# Altium PCB TYH-PD67W 2C1A AC板.pcbdoc
Units mm, origin at the board's own origin, x right, y up, seen from the top; angles counter-clockwise.
Board outline 94.32 x 66.89 mm, 5 copper layers (Top Layer, Signal Layer 3, Signal Layer 1, Signal Layer 2, Bottom Layer), stack 0.941 mm thick; 7 components, 153 nets, 24 pads, 78 vias.
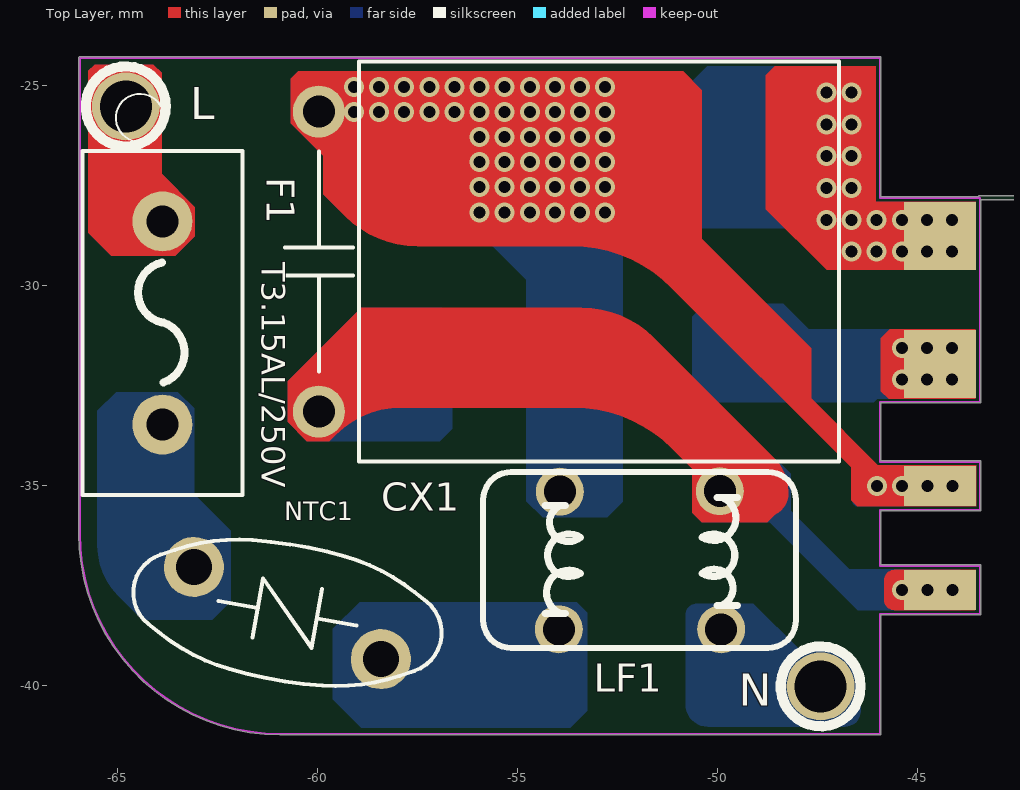
[diagram p0: Top Layer view]
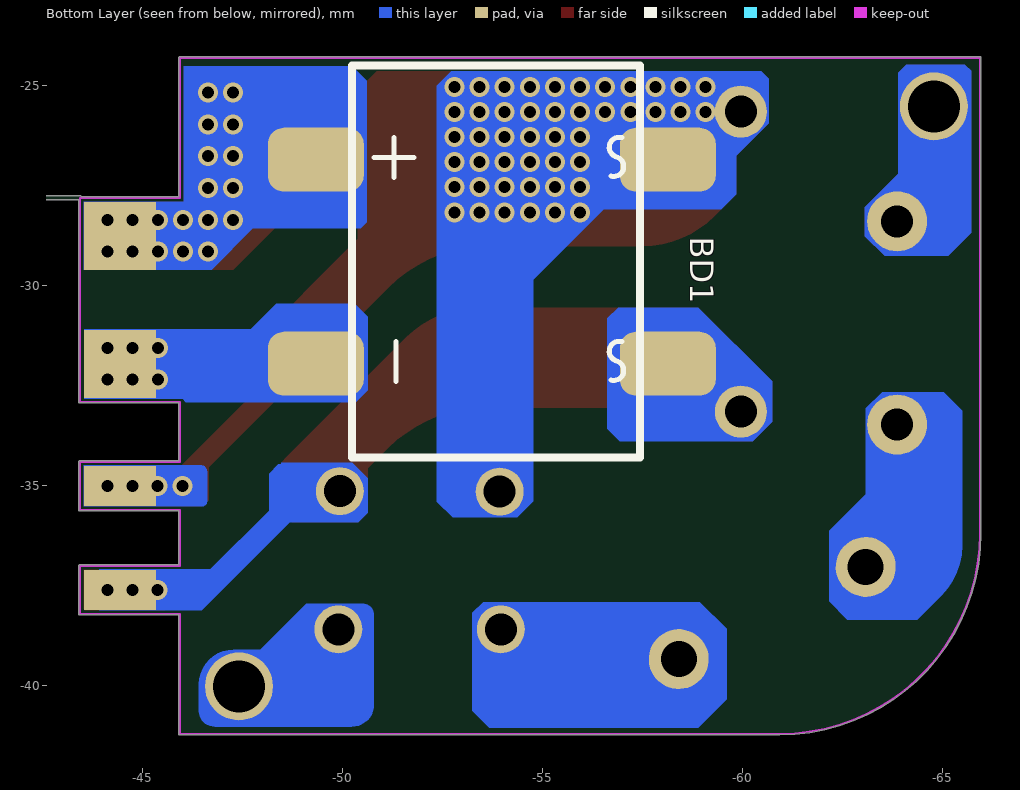
[diagram p1: Bottom Layer view, seen from below]

## Layer stack, top to bottom
Top Solder: solder mask 0.0102, Solder Resist, Dk 3.5
Top Layer: signal copper 0.0356
Dielectric 1: core 0.254, FR-4, Dk 4.2
Signal Layer 3: signal copper 0.036
Dielectric 4: prepreg 0.127, Dk 4.2
Signal Layer 1: signal copper 0.036
Dielectric 2: core 0.254, Dk 4.2
Signal Layer 2: signal copper 0.036
Dielectric 3: prepreg 0.127, Dk 4.2
Bottom Layer: signal copper 0.0356
Bottom Solder: solder mask 0.0102, Solder Resist, Dk 3.5

## Board outline
-60.945,-41.225 -45.944,-41.225 ccw(c-45.944,-41.2) -45.919,-41.2 -45.919,-38.225 -43.445,-38.225 ccw(c-43.445,-38.2) -43.419,-38.2 -43.419,-37 ccw(c-43.445,-37) -43.445,-36.975 -45.919,-36.975 -45.919,-35.625 -43.445,-35.625 ccw(c-43.445,-35.6) -43.419,-35.6 -43.419,-34.4 ccw(c-43.445,-34.4) -43.445,-34.375 -45.919,-34.375 -45.919,-32.925 -43.445,-32.925 ccw(c-43.445,-32.9) -43.419,-32.9 -43.419,-27.85 -39.751,-27.85 -39.759,-40.693 ccw(c-39.709,-40.7) -39.709,-40.75 -29.759,-40.752 -29.76,-42.002 ccw(c-29.71,-42.002) -29.71,-42.052 0,-42.052 ccw(c0,-42.002) 0.05,-42.002 0.05,-37.55 2.5,-37.55 ccw(c2.5,-37.5) 2.55,-37.5 2.55,-32.55 5.163,-32.55 5.16,-37.409 ccw(c5.21,-37.409) 5.16,-37.409 ccw(c8.207,-37.409) 8.207,-40.456 ccw(c8.207,-40.406) 8.207,-40.456 ccw(c8.207,-40.406) 8.207,-40.456 25.296,-40.456 ccw(c25.296,-40.406) 25.308,-40.455 ccw(c25.296,-37.407) 28.344,-37.407 28.352,-4.393 ccw(c28.302,-4.393) 28.352,-4.393 ccw(c28.302,-4.393) 28.351,-4.381 ccw(c25.304,-4.393) 25.304,-1.346 8.229,-1.346 ccw(c8.229,-4.393) 5.181,-4.375 ccw(c5.228,-4.393) 5.178,-4.393 5.175,-9.653 ccw(c5.225,-9.653) 5.225,-9.703 6.674,-9.704 6.673,-10.703 5.225,-10.702 ccw(c5.225,-10.753) 5.174,-10.753 5.163,-32.45 0.05,-32.45 0.05,-9.32 2.5,-9.32 ccw(c2.5,-9.269) 2.55,-9.269 2.55,-2.769 ccw(c2.5,-2.769) 2.5,-2.719 0.05,-2.719 0.05,0 ccw(c0,0) 0,0.05 -29.65,0.05 -29.65,1.682 2.433,1.682 ccw(c2.433,1.733) 2.483,1.733 ccw(c2.433,1.733) 2.482,1.745 ccw(c2.45,1.784) 2.5,1.784 2.5,3.584 ccw(c2.45,3.584) 2.45,3.635 0,3.635 0,22.484 ccw(c-0.05,22.484) -0.014,22.52 ccw(c-0.05,22.484) -0.05,22.535 -13.768,22.535 -13.768,24.784 ccw(c-13.819,24.784) -13.819,24.835 -26.819,24.835 ccw(c-26.819,24.784) -26.869,24.784 -26.869,22.535 -27.789,22.535 ccw(c-27.789,22.484) -27.84,22.483 -27.84,20.784 cw(c-28.289,20.784) -28.289,20.335 cw(c-28.289,20.784) -28.289,20.335 cw(c-28.289,20.284) -28.289,20.335 -30.217,20.335 ccw(c-30.217,20.284) -30.268,20.284 -30.268,1.733 ccw(c-30.217,1.733) -30.217,1.682 -29.75,1.682 -29.75,-1.25 -31.7,-1.25 ccw(c-31.7,-1.3) -31.75,-1.3 -31.75,-26.75 -39.7,-26.75 ccw(c-39.7,-26.8) -39.75,-26.8 -39.751,-27.75 -43.445,-27.75 ccw(c-43.445,-27.8) -43.488,-27.775 -45.919,-27.775 -45.919,-24.3 ccw(c-45.945,-24.3) -45.945,-24.275 -65.945,-24.275 ccw(c-65.945,-24.3) -65.97,-24.3 -65.97,-36.2 ccw(c-60.945,-36.2)

## Design rules (kind name [scope] priority, off if disabled: settings)
Clearance Clearance_19 [InNet('NetC4_2') vs InNet('PGND')] p1: gap=0.4
Clearance Clearance_18 [InNet('NetR15_1') vs InNet('PGND')] p2: gap=1
Clearance Clearance_17 [InNet('NetN_1') vs InNet('NetBD1_1')] p3: gap=1.55
Clearance Clearance_16 [InNet('NetN_1') vs InNet('PGND')] p4: gap=1.5
Clearance Clearance_15 [InNet('VIN') vs InNet('PGND')] p5 off: gap=5.8
Clearance Clearance_14 [InNet('CS') vs InNet('Bais-L')] p6: gap=0.45
Clearance Clearance_13 [InNet('SW') vs InNet('CS')] p7: gap=1.5
Clearance Clearance_12 [InNet('NetR15_1') vs InNet('CS')] p8: gap=1
Clearance Clearance_11 [InNet('NetBD1_3') vs InNet('CS')] p9: gap=1.1
Clearance Clearance_10 [InNet('HV') vs InNet('CS')] p10: gap=1.1
Clearance Clearance_9 [InNet('NetL2_1') vs InNet('CS')] p11: gap=1.5
Clearance Clearance_8 [InNet('NetC1_2') vs InNet('PGND')] p12: gap=1.2
Clearance Clearance_7 [InNet('NetBD1_3') vs InNet('PGND')] p13: gap=1.2
Clearance Clearance_6 [InNet('NetC2_2') vs InNet('PGND')] p14: gap=1.3
Clearance Clearance_5 [InNet('Bais-L') vs InNet('PGND')] p15: gap=0.45
Clearance Clearance_4 [InNet('SW') vs InNet('PGND')] p16: gap=1.5
Clearance Clearance_3 [InNet('HV') vs InNet('PGND')] p17: gap=1.2
Clearance Clearance_2 [InNet('NetL2_1') vs InNet('PGND')] p18: gap=1.5
Clearance Clearance_1 [OnLayer('Keep-Out Layer')] p19: gap=0.1
Clearance [All] p20: gap=0.2
PlaneConnect [All] p1: planeconnectstyle=Direct reliefexpansion=0.508 reliefentries=4 reliefconductorwidth=0.3 reliefairgap=0.254
PolygonConnect [All] p1: connectstyle=Direct reliefconductorwidth=0.3 reliefentries=4 polygonreliefangle="90 Angle" airgapwidth=0.3
RoutingVias [All] p1: holewidth=0.711 width=1.27 viastyle="Through Hole" minholewidth=0.711 minwidth=1.27 maxholewidth=0.711 maxwidth=1.27
SolderMaskExpansion [All] p1: expansion=0.05
Width [All] p1: maxlimit=10 minlimit=0.1 preferedwidth=0.2
28 further rules are at their usual default settings.

## Components (designator, comment, footprint, x,y, rotation, side; value= is the part's Value field where it differs from the comment)
BD1 "WRMSB40M" BD-WRLSB80M -49.344,-26.848 r180 bottom
CX1 "0.1uF" X-0.22SW -59.97,-33.147 r90 top
F1 "T3.15AL/250V" FUSE-5mm-l -63.878,-28.388 r270 top
L "Comment" PAD-AC -64.796,-25.515 r90 top
LF1 "Comment" L-6*3*3 -48.24,-36.854 r270 top
N "Comment" PAD-AC -47.423,-40.013 r90 top
NTC1 "" 5D-7-2 -61.365,-38.051 r160 top (schematic designator NTC)

## Footprints (in the part's own frame and the unit in brackets; to place one, negate y for a bottom-side part, rotate by r counter-clockwise, add the part's x,y. Pads: shape width x height; smd on the part's side, far side on the other; paste and mask are expansions set on the pad)
5D-7-2 [mm]
  round 1.5 hole 0.9: 1(1.973,-0.371) 2(-3.207,0.197)
  silkscreen extent -4.47,-1.92 3.24,1.74, body extent -5.36,-2.63 4.13,2.46, height 9.5
BD-WRLSB80M [mm]
  rrect50% 2.4x1.6 smd: 1(0,0) 2(8.8,0) 3(8.8,-5.1) 4(0,-5.1)
  silkscreen extent 0.9,-7.45 8.1,2.35, body extent -0.61,-7.55 9.39,2.45, height 1.61
FUSE-5mm-l [mm]
  round 1.5 hole 0.8: 1(0,0) 2(5.08,0)
  silkscreen extent -1.76,-2 6.84,2, body extent -1.76,-2 6.84,2, height 5.2
L-6*3*3 [mm]
  round 1.2 hole 0.8: 1(1.733,-5.729) 2(1.734,-1.669) 3(-1.708,-5.703) 4(-1.72,-1.706)
  silkscreen extent -2.2,-7.62 2.2,0.2, body extent -1.95,-7.4 2,0.02, height 7.21
PAD-AC [mm]
  round 1.7 hole 1.3: 1(0,0)
  silkscreen extent -1,-1 1,1
X-0.22SW [mm]
  round 1.3 hole 0.8: 1(0,0) 2(7.5,0)
  silkscreen extent -1.25,-13 8.75,0.85, body extent -1.25,-13 8.75,0.2, height 5.2

## Part data
BD1: library part BRIDGE1
CX1: library part Cap_dip, "Capacitor"
F1: library part FUSE2
NTC1: library part NTC

## Free pads (board coordinates)
  rect 1.8x1 smd far side: 0(-44.445,-37.6) 0(-44.445,-35)
  rect 1.8x1 smd: 0(-44.445,-37.6) 0(-44.445,-35)
  rect 1.8x1.7 smd far side: 0(-44.445,-31.95) 0(-44.445,-28.75)
  rect 1.8x1.7 smd: 0(-44.445,-31.95) 0(-44.445,-28.75)

## Via types
v1: diameter 0.5, hole 0.3, Top Layer to Bottom Layer, tented both sides, 78 vias

## Nets (pads, with @x,y where several pads share a name; then routed paths per layer and width w, separated by ;. In a path a pad name is that pad's centre, name@x,y a point inside that pad or via, vN(x,y) a via of type N, cw(c..) or ccw(c..) an arc to the next point about the centre after c; other vN are vias at no path point)
3.3V: 
A: 
A+: 
A-: 
Bais-L: 
BOOT0: 
CC1: 
CC2: 
CPA: 
CS: 
D: NTC1.2
D+: 
D-: 
DM: 
DP: 
EM: 
EN: 
EN_IC: 
FB: 
G-SR: 
GND-C: 
HV: 
ISET: 
KEY: 
KEY1: 
LEDA: 
M: 
N: LF1.2 N.1
NetBD1_1: BD1.2 CX1.2 LF1.3 pad.0@-44.445,-35 | length 23.7
  Top Layer w0.2: -53.626,-28.366 -52.48,-28.366 ; -52.475,-28.507 -46.76,-34.222 ccw(c-44.964,-32.426) pad.0@-44.964,-34.966
  Bottom Layer w0.2: BD1.2@-58.149,-26.707 -56.337,-26.707 cw(c-56.337,-29.247) -54.541,-27.451 -53.626,-28.366 ; -53.622,-28.507 cw(c-55.418,-30.303) -52.878,-30.303 -52.878,-35.132 ; v1@-45.349,-35 pad.0@-44.817,-35
  other v1: -46.014,-35 -45.386,-35 -44.758,-35 -44.131,-35 -55.951,-28.163 -55.323,-28.163 -54.695,-28.163 -54.068,-28.163 -53.44,-28.163 -52.812,-28.163 -55.951,-27.535 -55.323,-27.535 -54.695,-27.535 -54.068,-27.535 -53.44,-27.535 -52.812,-27.535 -55.951,-26.907 -55.323,-26.907 -54.695,-26.907 -54.068,-26.907 -53.44,-26.907 -52.812,-26.907 -55.951,-26.279 -55.323,-26.279 -54.695,-26.279 -54.068,-26.279 -53.44,-26.279 -52.812,-26.279 -59.09,-25.651 -58.463,-25.651 -57.835,-25.651 -57.207,-25.651 -56.579,-25.651 -55.951,-25.651 -55.323,-25.651 -54.695,-25.651 -54.068,-25.651 -53.44,-25.651 -52.812,-25.651 -59.09,-25.024 -58.463,-25.024 -57.835,-25.024 -57.207,-25.024 -56.579,-25.024 -55.951,-25.024 -55.323,-25.024 -54.695,-25.024 -54.068,-25.024 -53.44,-25.024 -52.812,-25.024
NetBD1_3: BD1.1 pad.0@-44.445,-28.75 | length 5.3
  Bottom Layer w0.2: BD1.1 -48.261,-26.848 -46.36,-28.75 pad.0@-44.817,-28.75
  other v1: -46.65,-29.148 -46.022,-29.148 -45.395,-29.148 -44.767,-29.148 -44.139,-29.148 -47.278,-28.352 -46.65,-28.352 -46.022,-28.352 -45.395,-28.352 -44.767,-28.352 -44.139,-28.352 -47.278,-27.556 -46.65,-27.556 -47.278,-26.759 -46.65,-26.759 -47.278,-25.963 -46.65,-25.963 -47.278,-25.167 -46.65,-25.167
NetBD2_1: 
NetC1_2: 
NetC2_2: 
NetC3_2: 
NetC4_1: 
NetC4_2: 
NetC6_1: 
NetC10_2: 
NetC21_1: 
NetC22_1: 
NetC24_1: 
NetC25_2: 
NetC26_2: 
NetC30_2: 
NetC31_2: 
NetC100_2: 
NetC101_1: 
NetC101_2: 
NetC112_1: 
NetD4_K: 
NetF1_1: F1.1 L.1
NetF1_2: F1.2 NTC1.1
NetKEY1_1: 
NetL2_1: 
NetLF1_2: LF1.1
NetN_1: BD1.3 CX1.1 LF1.4 pad.0@-44.445,-37.6 | length 17.6
  Top Layer w0.2: CX1.1 -59.535,-32.712 cw(c-57.739,-34.508) -57.739,-31.968 -53.085,-31.968 cw(c-53.085,-34.508) -51.289,-32.712 -48.881,-35.12
  Bottom Layer w0.2: -48.881,-35.12 -47.145,-36.856 ccw(c-45.349,-35.06) -45.349,-37.6 pad.0@-44.817,-37.6
  other v1: -45.386,-37.6 -44.758,-37.6 -44.131,-37.6
NetNTC2_1: 
NetQ1_3: 
NetQ3_4: 
NetR15_1: 
NetR25_2: 
NetR29_1: 
NetR31_2: 
NetR32_2: 
NetR41_2: 
NetR42_2: 
NetR134_1: 
NetRX1_2: 
NetRX3_2: 
NetU1_26: 
NetU1_27: 
NetU1_28: 
NetU1_29: 
NetU1_30: 
NetU1_32: 
NewNet1: 
NewNet2: 
NewNet3: 
NewNet4: 
NewNet5: 
NewNet6: 
NewNet7: 
NewNet8: 
NewNet9: 
NewNet10: 
NewNet11: 
NewNet12: 
NewNet13: 
NewNet14: 
NewNet15: 
NewNet16: 
NewNet18: 
NewNet22: 
NewNet23: 
NewNet24: 
NewNet25: 
NewNet28: 
NewNet32: 
NewNet33: 
NewNet34: 
NewNet36: 
NewNet38: 
NewNet40: 
NewNet41: 
NewNet42: 
OPTO: 
OTP: 
PA2: 
PA4: 
PA5: 
PA6: 
PA7: 
PA8: 
PA9: 
PB0: 
PB1: 
PF0: 
PF1: 
PF3: 
PGND: BD1.4 pad.0@-44.445,-31.95 | length 4.5
  Bottom Layer w0.3: BD1.4@-49.343,-31.95 pad.0@-44.817,-31.95
  other v1: -45.395,-32.348 -44.767,-32.348 -44.139,-32.348 -45.395,-31.552 -44.767,-31.552 -44.139,-31.552
RS: 
RST: 
SCL: 
SCL1: 
SDA: 
SDA1: 
SET: 
SGND: 
SRCG_A: 
SW: 
SW-SR: 
SWCLK: 
SWCLK1: 
SWCLK2: 
SWDIO: 
SWDIO1: 
SWDIO2: 
SWRST: 
TXD: 
U2-2: 
V3V3: 
VBUS: 
VC: 
VDD: 
VDD1: 
VDS: 
VFB: 
VFB1: 
VIN: 
VMS: 
VOUT1: 
VXO: 
XGND: 

## Keep-outs
Keep-Out Layer:
  lines w0.05: -65.945,-36.2 ccw(c-60.945,-36.2) -60.945,-41.2 -45.944,-41.2 -45.944,-38.2 -43.445,-38.2 -43.445,-37 -45.944,-37 -45.944,-35.6 -43.445,-35.6 -43.445,-34.4 -45.944,-34.4 -45.944,-32.9 -43.445,-32.9 -43.445,-27.8 -45.945,-27.8 -45.945,-24.3 -65.945,-24.3 -65.945,-36.2

## Other copper
Top Layer:
  region net NetN_1: -48.266,-35.415 -48.76,-35.91 -50.402,-35.91 -50.638,-35.674 -50.638,-33.942 -50.553,-33.857 -49.503,-33.857 -48.241,-35.119 -48.241,-35.293
  region net NetF1_1: -65.732,-24.629 -65.732,-28.677 -65.16,-29.249 -63.562,-29.249 -63.071,-28.758 -63.071,-28.032 -63.902,-27.202 -63.902,-24.672 -64.106,-24.467 -65.57,-24.467
  region net NetBD1_3: -43.544,-29.603 -47.276,-29.603 -48.799,-28.08 -48.799,-24.741 -48.567,-24.509 -46.049,-24.509 -46.049,-27.899 -43.544,-27.899
  region net PGND: -43.553,-32.826 -45.727,-32.826 -45.919,-32.634 -45.919,-31.315 -45.692,-31.087 -43.553,-31.087
  region net NetN_1: -45.835,-37.643 -45.835,-37.36 cw(c-45.578,-37.36) -45.578,-37.104 -43.549,-37.104 -43.549,-38.077 cw(c-43.577,-38.077) -43.577,-38.105 -45.581,-38.105 cw(c-45.581,-37.853) -45.833,-37.853
  region net NetBD1_1: -60.485,-24.639 -50.862,-24.639 -50.397,-25.105 -50.397,-28.829 -47.662,-31.564 -47.662,-32.815 -45.991,-34.487 -43.538,-34.487 -43.538,-35.511 -46.507,-35.511 -46.662,-35.356 -46.662,-34.536 -51.153,-30.045 ccw(c-53.661,-32.553) -53.661,-29.006 -57.511,-29.006 cw(c-57.511,-26.466) -59.307,-28.262 -59.853,-27.716 -59.853,-26.754 -60.673,-25.935 -60.673,-24.826
  region net NetN_1: -59.704,-33.883 -59.546,-33.725 cw(c-57.898,-35.373) -57.898,-33.043 -53.602,-33.043 cw(c-53.602,-36.512) -51.149,-34.059 -49.778,-35.429 ccw(c-48.891,-34.542) -48.891,-35.797 -48.855,-35.797 ccw(c-48.855,-35.171) -48.229,-35.171 ccw(c-49.449,-35.171) -48.587,-34.309 -51.605,-31.29 ccw(c-53.401,-33.087) -53.401,-30.547 -58.911,-30.547 -60.752,-32.388 -60.752,-33.4 -60.269,-33.883
Bottom Layer:
  region net NetN_1: -48.481,-34.429 -50.259,-34.429 -50.638,-34.808 -50.638,-35.674 -50.402,-35.91 -48.726,-35.91 -48.481,-35.665
  region: -56.159,-37.908 -58.948,-37.908 -59.619,-38.579 -59.619,-40.339 -58.909,-41.049 -56.318,-41.049 -55.88,-40.612 -55.88,-38.186
  region net PGND: -43.553,-31.087 -47.721,-31.087 -48.357,-30.451 -50.313,-30.451 -50.639,-30.777 -50.639,-32.614 -50.345,-32.908 -46.097,-32.908 -46.014,-32.826 -43.553,-32.826
  region net NetBD1_3: -50.623,-24.873 -50.623,-28.409 -50.465,-28.567 -47.773,-28.567 -46.737,-29.603 -43.544,-29.603 -43.544,-27.899 -46.049,-27.899 -46.049,-24.509 -50.26,-24.509
  region net NetN_1: -49.391,-34.459 -48.411,-34.459 -48.176,-34.695 -48.176,-35.621 -46.709,-37.087 -43.934,-37.087 -43.934,-38.11 -46.496,-38.11 -48.696,-35.91 -49.296,-35.91 -49.613,-35.593 -49.613,-34.681
  region net NetBD1_1: -52.726,-24.639 -52.367,-24.998 -52.367,-35.395 -52.763,-35.791 -54.375,-35.791 -54.783,-35.383 -54.783,-29.852 -56.548,-28.087 -59.482,-28.087 -59.853,-27.716 -59.853,-26.754 -60.673,-25.935 -60.673,-24.826 -60.485,-24.639
  region net NetLF1_2: -57.846,-41.049 -53.683,-41.049 -53.259,-40.625 -53.259,-38.173 -53.524,-37.908 -56.159,-37.908 -58.154,-39.902 -58.154,-40.741
  region net NetN_1: -60.269,-33.883 -56.943,-33.883 -56.633,-33.572 -56.633,-30.815 -56.901,-30.547 -58.911,-30.547 -60.752,-32.388 -60.752,-33.4
  region net NetF1_1: -65.732,-24.629 -65.732,-28.677 -65.16,-29.249 -63.562,-29.249 -63.071,-28.758 -63.071,-28.032 -63.902,-27.202 -63.902,-24.672 -64.106,-24.467 -65.57,-24.467
  region net N: -49.104,-37.943 -47.949,-39.097 -47.285,-39.097 cw(c-47.285,-39.958) -46.423,-39.958 -46.423,-40.632 cw(c-46.813,-40.632) -46.813,-41.021 -50.245,-41.021 cw(c-50.245,-40.467) -50.799,-40.467 -50.799,-38.23 cw(c-50.512,-38.23) -50.512,-37.943
  region net NetF1_2: -65.04,-32.655 -63.501,-32.655 -63.089,-33.066 -63.089,-35.215 -62.175,-36.129 -62.175,-37.888 -62.633,-38.345 -64.38,-38.345 -64.994,-37.731 cw(c-63.763,-36.5) -65.504,-36.5 -65.504,-33.119
  region net NetBD1_1: -46.507,-35.511 -43.538,-35.511 -43.538,-34.487 -46.474,-34.487 ccw(c-46.474,-34.637) -46.625,-34.637 -46.625,-35.394 ccw(c-46.507,-35.394)

## Silkscreen, mask and mechanical layers (free items; w line width, h text height)
Top Overlay:
  circle w0.05: c-64.445,-25.8 r0.6